# Altium PCB SyncBoard1.PcbDoc (part 1 of 4)
Units mm, origin at the board's own origin, x right, y up, seen from the top; angles counter-clockwise.
Board outline 300 x 250 mm, 2 copper layers (Top Layer, Bottom Layer); 311 components, 299 nets, 1572 pads, 3310 vias.
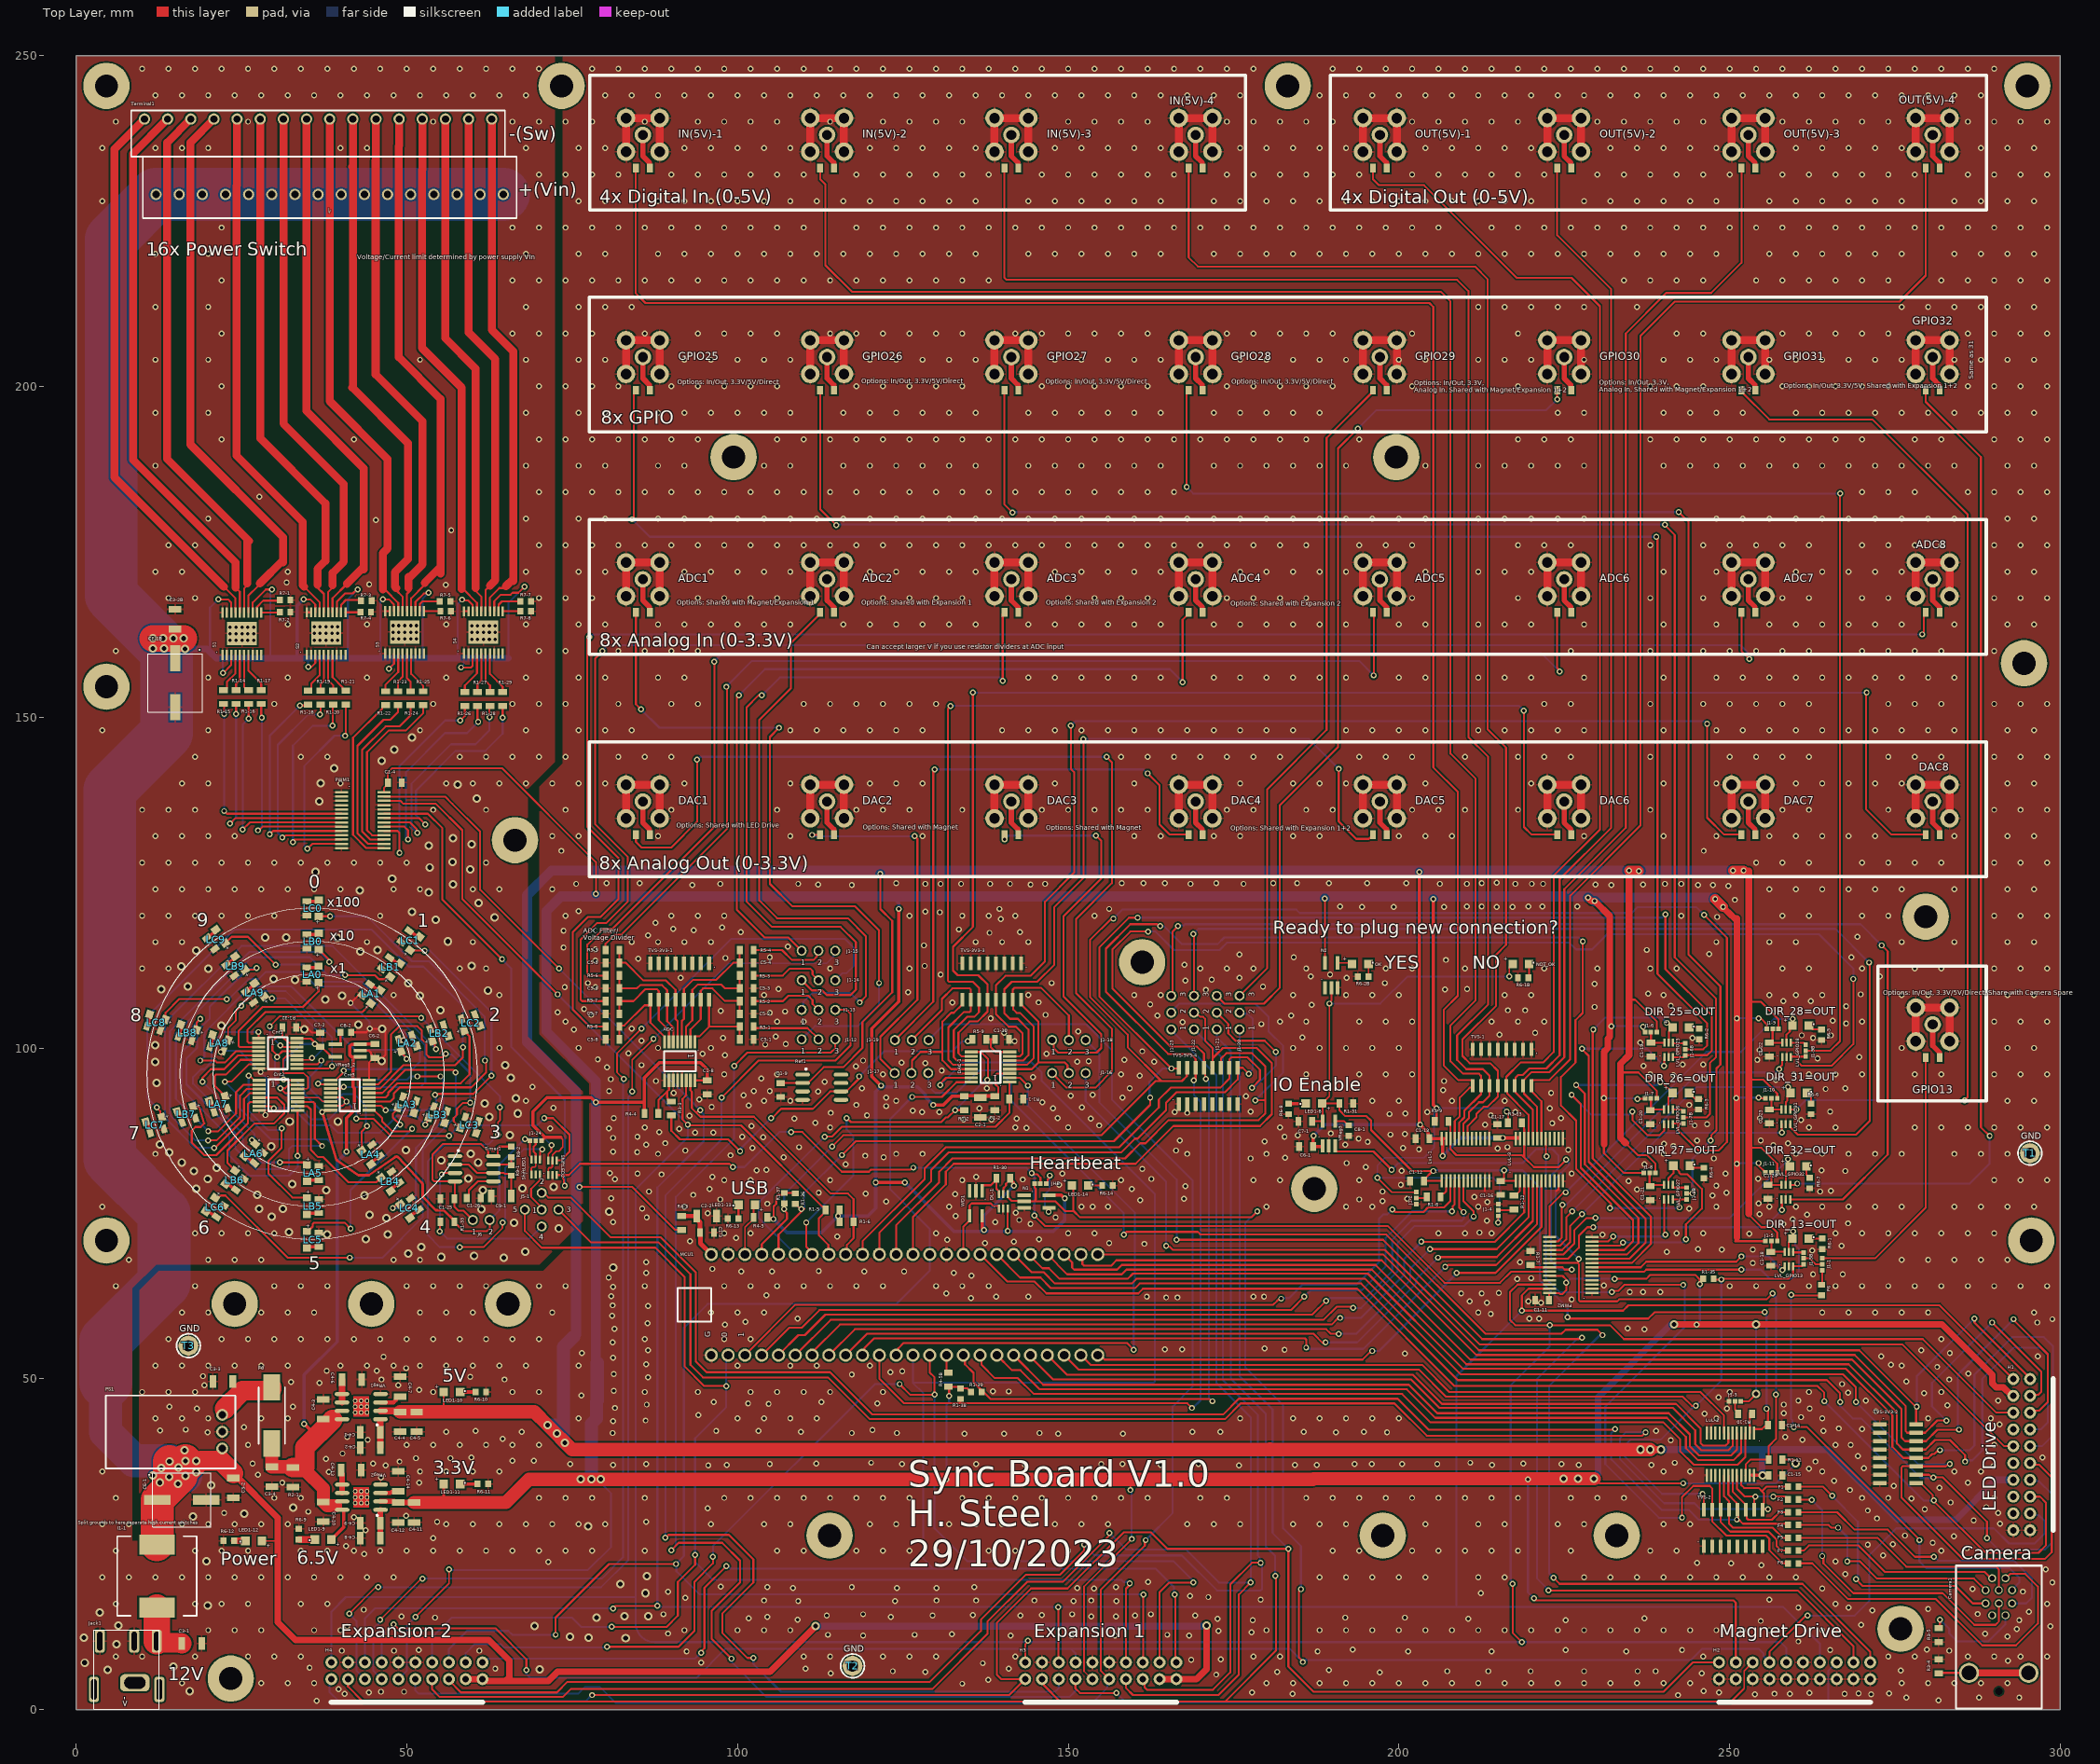
[diagram p0: Top Layer view]
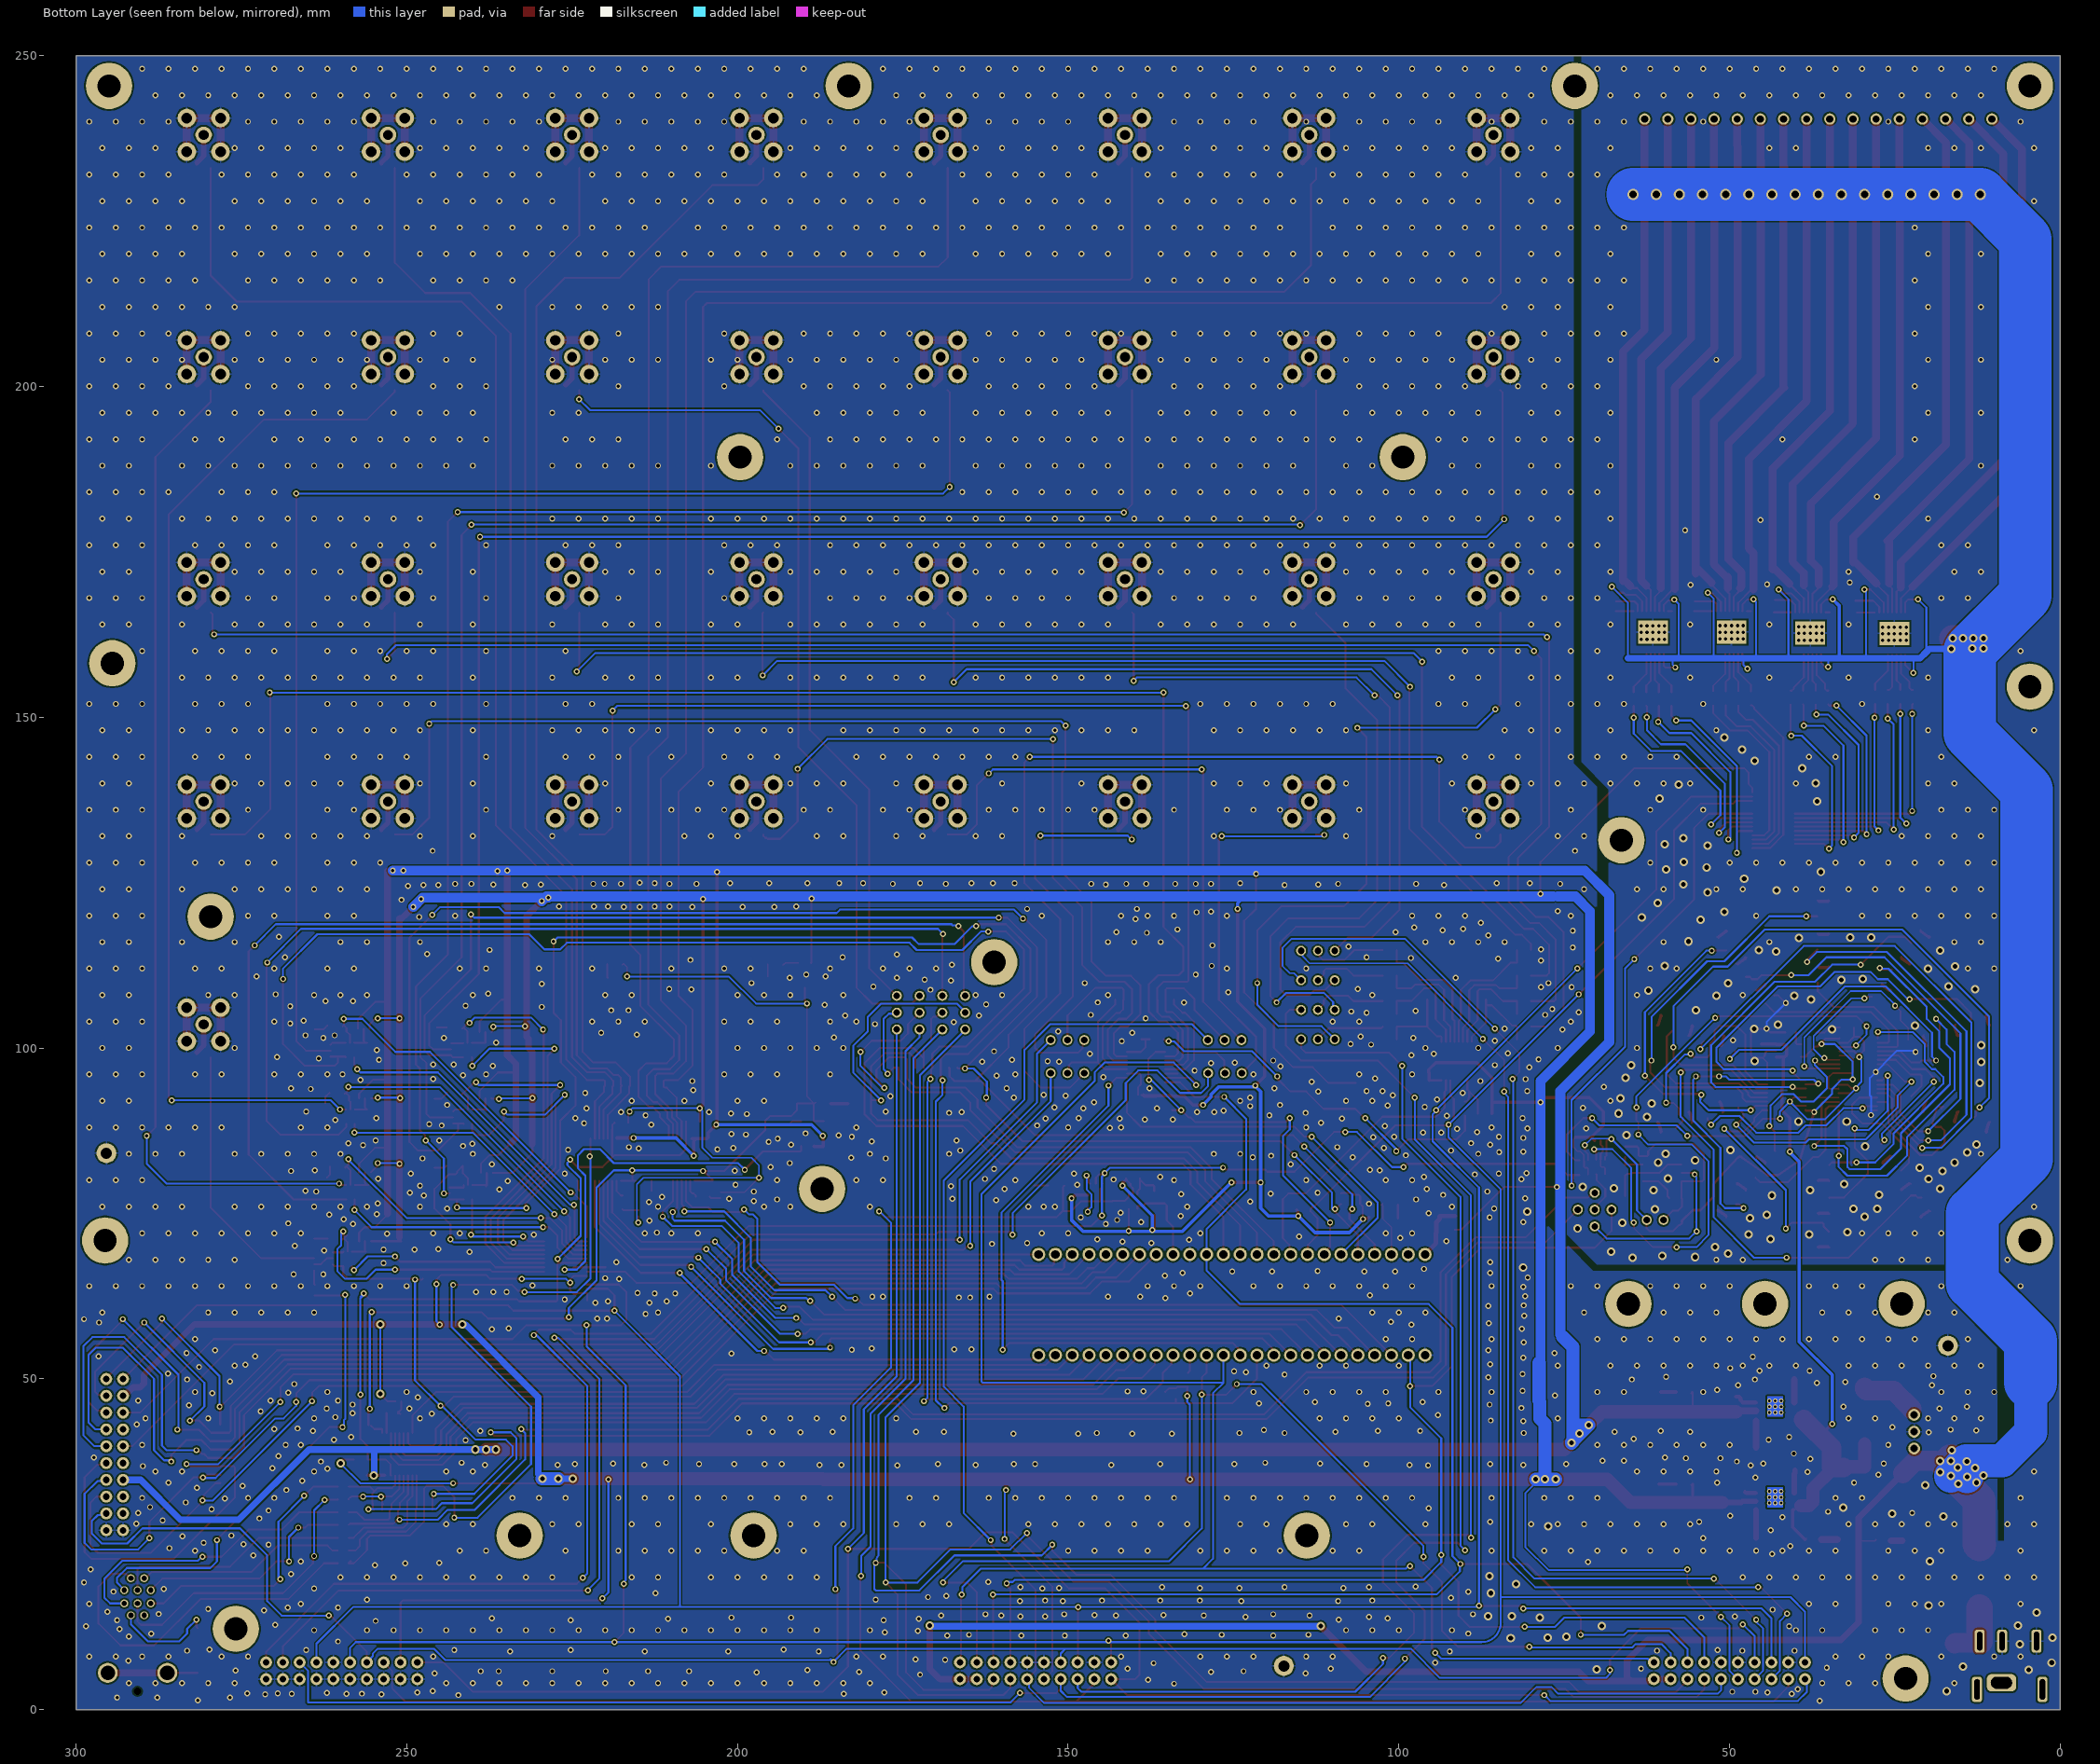
[diagram p1: Bottom Layer view, seen from below]

## Layer stack, top to bottom
Top Solder: solder mask 0.0102, Solder Resist, Dk 3.5
Top Layer: signal copper 0.0356
Dielectric 1: dielectric 0.32, FR-4, Dk 4.8
Bottom Layer: signal copper 0.0356
Bottom Solder: solder mask 0.0102, Solder Resist, Dk 3.5

## Board outline
0,0 300,0 300,250 0,250

## Design rules (kind name [scope] priority, off if disabled: settings)
Clearance [All] p1: gap=0.25 ignorepadtopadclearanceinfootprint=TRUE except(0: Arc-Text Track-Text SMDPad-Text THPad-Text Via-Text Fill-Text Poly-Text Region-Text Text-Text Text-Hole; 0.2: SMDPad-SMDPad THPad-THPad)
HoleSize [All] p1: absolutevalues=TRUE maxlimit=99 minlimit=0.025 maxpercent=80.000 minpercent=20.000
MinimumSolderMaskSliver [All] p1: minsoldermaskwidth=0
PlaneConnect [All] p1: planeconnectstyle=Direct reliefexpansion=0.508 reliefentries=4 reliefconductorwidth=0.254 reliefairgap=0.254
PolygonConnect [All] p1: thpad.connectstyle=Relief thpad.reliefconductorwidth=0.3 thpad.reliefentries=4 thpad.polygonreliefangle="90 Angle" thpad.airgapwidth=0.254 smdpad.connectstyle=Relief smdpad.reliefconductorwidth=0.3 smdpad.reliefentries=4 smdpad.polygonreliefangle="90 Angle" smdpad.airgapwidth=0.254 via.connectstyle=Direct via.reliefconductorwidth=0.5 via.reliefentries=4 via.polygonreliefangle="90 Angle" via.airgapwidth=0.254
RoomDefinition SyncBoard1 [InComponentClass('SyncBoard1')] p1: confinementstyle=ConfineIn formatcopy=TRUE lockcomponents=FALSE outline 303.8,45.1 347.9,45.1 347.9,114.9 303.8,114.9
RoutingVias [All] p1: holewidth=0.45 width=0.8 viastyle="Through Hole" minholewidth=0.3 minwidth=0.5 maxholewidth=2 maxwidth=10
SolderMaskExpansion [All] p1: expansion=0.102 istentingtop=FALSE
Width [All] p1: maxlimit=50 minlimit=0.254 preferedwidth=0.254 minimp=50.000000 maximp=50.000000 favimp=50.000000
27 further rules are at their usual default settings.

## Classes and differential pairs
component class SyncBoard1: ADC ADC1 ADC2 ADC3 ADC4 ADC5 ADC6 ADC7 ADC8 C2-1 C2-2 C3-1 C3-2 C3-2B C3-3 C3-4 C4-1 C4-2 C4-3 C4-4 C4-5 C4-6 C4-7 C4-8 C4-9 C4-10 C4-11 C4-12 C4-13 C4-14 C5-1 C5-2 C5-3 C5-4 C5-5 C5-6 C5-7 C5-8 C6-1 C6-2 C7-1 C7-2 C8-1 C8-2 C9-1 Camera1 CE-1 CE-1B Cnt1 Cnt2 Cnt3 DAC1 DAC2 DAC3 DAC4 DAC5 DAC6 DAC7 DAC8 DAC-1 DIR_13=OUT DIR_25=OUT DIR_26=OUT DIR_27=OUT DIR_28=OUT DIR_31=OUT DIR_32=OUT DL-1 F0 F1 F2 F3 F4 F5 F6 F7 F8 GPIO13 GPIO25 GPIO26 GPIO27 GPIO28 GPIO29 GPIO30 GPIO31 GPIO32 H1 H2 H3 H4 I1-1 IN(5V)-1 IN(5V)-2 IN(5V)-3 IN(5V)-4 J1-1 J1-2 J1-3 J1-4 J1-5 J1-5B J1-6 J1-6B J1-7 J1-7B J1-8 J1-8B J1-9 J1-9B J1-10 J1-11 J1-12 J1-13 J1-14 J1-15 J1-16 J1-17 J1-18 J1-19 J1-20 J1-21 J1-22 J1-23 J1-24 J5-1 J6 Jack1 JHB LA0 LA1 LA2 LA3 LA4 LA5 LA6 LA7 LA8 LA9 LB0 LB1 LB2 LB3 LB4 LB5 LB6 LB7 LB8 LB9 LC0 LC1 LC2 LC3 LC4 LC5 LC6 LC7 LC8 LC9 LED1-8 LED1-9 LED1-10 LED1-11 LED1-12 LED1-13 LED1-14 LvL-1 LvL-2 LvL-3 LVL_GPIO13 LVL_GPIO25 LVL_GPIO26 LVL_GPIO27 LVL_GPIO28 LVL_GPIO31 LVL_GPIO32 MCU1 N1 N2 NOT_OK OK OUT(5V)-1 OUT(5V)-2 OUT(5V)-3 OUT(5V)-4 PS1 PWM1 PWM2 R1-1 R1-2 R1-5 R1-6 R1-7 R1-8 R1-9 R1-10 R1-11 R1-12 R1-13 R1-14 R1-15 R1-16 R1-17 R1-18 R1-19 R1-20 R1-21 R1-22 R1-23 R1-24 R1-25 R1-26 R1-27 R1-28 R1-29 R1-30 R1-31 R1-32 R1-33 R1-35 R1-36 R1-37 R1-38 R1-39 R2-1 R3-3 R3-4 R3-5 R4-3 R4-4 R4-5 R4-5B R5-1 R5-2 R5-3 R5-4 R5-5 R5-6 R5-7 R5-8 R5-9 R6-1 R6-1B R6-2 R6-2B R6-3 R6-4 R6-5 R6-6 R6-7 R6-8 R6-9 R6-10 R6-11 R6-12 R6-13 R6-14 R7-1 R7-2 R7-3 R7-4 R7-5 R7-6 R7-7 R7-8 R9-1 R9-2 Ref1 S1 S2 S3 S4 ShiftLED1 ShiftLED2 T1 T2 T3 Terminal1 Timer1 TVS-1 TVS-2 TVS-3V3-1 TVS-3V3-2 TVS-3V3-3 TVS-3V3-4 VReg1 VReg2 VReg3 VReg5_2 WD1

## Components (designator, comment, footprint, x,y, rotation, side; value= is the part's Value field where it differs from the comment)
ADC "ADS7828" 16-TSSOP 93.546,100.9 r270 top
ADC1 "SMA_Female" SMA_Ferrite 85.7,170.831 r180 top
ADC2 "SMA_Female" SMA_Ferrite 113.557,170.831 r180 top
ADC3 "SMA_Female" SMA_Ferrite 141.414,170.831 r180 top
ADC4 "SMA_Female" SMA_Ferrite 169.271,170.831 r180 top
ADC5 "SMA_Female" SMA_Ferrite 197.129,170.831 r180 top
ADC6 "SMA_Female" SMA_Ferrite 224.986,170.831 r180 top
ADC7 "SMA_Female" SMA_Ferrite 252.843,170.831 r180 top
ADC8 "SMA_Female" SMA_Ferrite 280.7,170.831 r180 top
C1-2 "0.1uF" 0805 138.9,92.7 r270 top
C1-3 "0.1uF" 0805 94.346,72.1 r0 top
C1-4 "0.1uF" 0805 47.146,140.1 r0 top
C1-8 "0.1uF" 0805 95.446,95.1 r270 top
C1-9 "0.1uF" 0805 106.546,94.7 r270 top
C1-10 "0.1uF" 0805 141.046,101.3 r180 top
C1-11 "0.1uF" 0805 222.7,61.9 r180 top
C1-12 "0.1uF" 0805 203.8,79.9 r180 top
C1-13 "0.1uF" 0805 202.5,86.3 r0 top
C1-14 "0.1uF" 0805 255.8,43 r0 top
C1-15 "0.1uF" 0805 258,35.4 r180 top
C1-16 "0.1uF" 0805 215.4,79.9 r270 top
C1-17 "0.1uF" 0805 214.9,88.5 r270 top
C1-18 "0.1uF" 0805 256.2,69.2 r270 top
C1-19 "0.1uF" 0805 238.1,100.8 r270 top
C1-20 "0.1uF" 0805 238,90.6 r270 top
C1-21 "0.1uF" 0805 238,79.1 r270 top
C1-22 "0.1uF" 0805 256,100.8 r270 top
C1-23 "0.1uF" 0805 256,90.7 r270 top
C1-24 "0.1uF" 0805 255.8,79.3 r270 top
C1-25 "0.1uF" 0805 55.1,77.2 r0 top
C1-26 "0.1uF" 0805 61.2,77.3 r180 top
C2-1 "10uF" 1206 136.7,89.5 r90 top
C2-2 "10uF" 1206 93.846,74.6 r0 top
C3-1 "10uF X7R" 1206 16,10 r0 top
C3-2 "10uF X7R" 1206 23.8,35 r270 top
C3-2B "10uF X7R" 1206 15,163.3 r90 top
C3-3 "10uF X7R" 1206 23.7,49.6 r180 top
C3-4 "10uF X7R" 1206 29.6,36.7 r270 top
C4-1 "22uF X7R" 1206 46,41.9 r180 top
C4-2 "22uF X7R" 1206 46,39.6 r180 top
C4-3 "22uF X7R" 1206 37.4,43.9 r90 top
C4-4 "22uF X7R" 1206 49,42 r90 top
C4-5 "22uF X7R" 1206 51.5,42 r90 top
C4-6 "10uF X7R" 1206 43.2,49.9 r180 top
C4-7 "22uF X7R" 1206 49,50.3 r270 top
C4-8 "22uF X7R" 1206 46,25.9 r180 top
C4-9 "22uF X7R" 1206 46,28.2 r180 top
C4-10 "22uF X7R" 1206 37.4,31.4 r270 top
C4-11 "22uF X7R" 1206 51.1,28.3 r90 top
C4-12 "22uF X7R" 1206 48.7,28.3 r90 top
C4-13 "10uF X7R" 1206 43.1,36.2 r180 top
C4-14 "22uF X7R" 1206 48.7,36 r270 top
C5-1 "NC" 0805 100.346,101.3 r0 top
C5-2 "NC" 0805 100.346,105.157 r0 top
C5-3 "NC" 0805 100.346,109.014 r0 top
C5-4 "NC" 0805 100.346,112.871 r0 top
C5-5 "NC" 0805 82.146,112.871 r180 top
C5-6 "NC" 0805 82.146,109.014 r180 top
C5-7 "NC" 0805 82.146,105.157 r180 top
C5-8 "NC" 0805 82.146,101.3 r180 top
C6-1 "1uF X7R" 0805 184.9,85.1 r0 top
C6-2 "1uF X7R" 0805 45.2,98.5 r90 top
C7-1 "4.7uF X7R" 0805 184.8,88.9 r0 top
C7-2 "4.7uF X7R" 0805 36.9,102.3 r270 top
C8-1 "0.01uF X7R" 0603 192.4,86.7 r90 top
C8-2 "0.01uF X7R" 0603 41.576,102.359 r180 top
C9-1 "0.33uF" 1206 62.8,77.6 r0 top
Camera1 "KinetixCameraConnector" Connector_HR212 290.7,2.75 r90 top
CE-1 "220uF" ElectrolyticCapacitor 16,31.7 r270 top
CE-1B "220uF" ElectrolyticCapacitor 15,155.2 r180 top
Cnt1 "Counter_$017" 16-TSSOP 27.6,101.45 r0 top
Cnt2 "Counter_$017" 16-TSSOP 27.7,95.1 r0 top
Cnt3 "Counter_$017" 16-TSSOP 44.3,90.6 r180 top
DAC1 "SMA_Female" SMA_Ferrite 85.7,137.246 r180 top
DAC2 "SMA_Female" SMA_Ferrite 113.557,137.246 r180 top
DAC3 "SMA_Female" SMA_Ferrite 141.414,137.246 r180 top
DAC4 "SMA_Female" SMA_Ferrite 169.271,137.246 r180 top
DAC5 "SMA_Female" SMA_Ferrite 197.129,137.246 r180 top
DAC6 "SMA_Female" SMA_Ferrite 224.986,137.246 r180 top
DAC7 "SMA_Female" SMA_Ferrite 252.843,137.246 r180 top
DAC8 "SMA_Female" SMA_Ferrite 280.7,137.246 r180 top
DAC-1 "AD5668-2" 16-TSSOP 141.146,94.85 r180 top
DIR_13=OUT "LEDindicator" LEDindicator 262,71.2 r180 top
DIR_25=OUT "LEDindicator" LEDindicator 243.9,103.1 r180 top
DIR_26=OUT "LEDindicator" LEDindicator 243.9,93.2 r180 top
DIR_27=OUT "LEDindicator" LEDindicator 244,82.2 r180 top
DIR_28=OUT "LEDindicator" LEDindicator 262,103.4 r180 top
DIR_31=OUT "LEDindicator" LEDindicator 261.7,93.2 r180 top
DIR_32=OUT "LEDindicator" LEDindicator 261.6,82.1 r180 top
DL-1 "DLatch" "6-TSSOP / SC-70-6" 139.546,75.7 r90 top
F0 "FerriteBead1" FerriteBead1 29.6,48.7 r270 top
F1 "FerriteBead2" 0603 260.4,33.7 r180 top
F2 "FerriteBead2" 0603 260.4,31.767 r180 top
F3 "FerriteBead2" 0603 260.4,29.833 r180 top
F4 "FerriteBead2" 0603 260.4,27.9 r180 top
F5 "FerriteBead2" 0603 260.4,25.967 r180 top
F6 "FerriteBead2" 0603 263.9,62.6 r90 top
F7 "FerriteBead2" 0603 260.4,24.033 r180 top
F8 "FerriteBead2" 0603 260.4,22.1 r180 top
GPIO13 "SMA_Female" SMA_Ferrite 280.7,103.55 r180 top
GPIO25 "SMA_Female" SMA_Ferrite 85.7,204.415 r180 top
GPIO26 "SMA_Female" SMA_Ferrite 113.557,204.415 r180 top
GPIO27 "SMA_Female" SMA_Ferrite 141.414,204.415 r180 top
GPIO28 "SMA_Female" SMA_Ferrite 169.271,204.415 r180 top
GPIO29 "SMA_Female" SMA_Ferrite 197.129,204.415 r180 top
GPIO30 "SMA_Female" SMA_Ferrite 224.986,204.415 r180 top
GPIO31 "SMA_Female" SMA_Ferrite 252.843,204.415 r180 top
GPIO32 "SMA_Female" SMA_Ferrite 280.7,204.415 r180 top
H1 "Header_RA_2x10" "HeaderRA 2x10" 295.421,49.963 r270 top
H2 "Header_RA_2x10" "HeaderRA 2x10" 271.26,4.6 r180 top
H3 "Header_RA_2x10" "HeaderRA 2x10" 166.36,4.6 r180 top
H4 "Header_RA_2x10" "HeaderRA 2x10" 61.46,4.6 r180 top
I1-1 "15uH" Inductor1 12.1,15.5 r90 top
IN(5V)-1 "SMA_Female" SMA_Ferrite 85.7,238 r180 top
IN(5V)-2 "SMA_Female" SMA_Ferrite 113.557,238 r180 top
IN(5V)-3 "SMA_Female" SMA_Ferrite 141.414,238 r180 top
IN(5V)-4 "SMA_Female" SMA_Ferrite 169.271,238 r180 top
J1-1 "Jumper3" Jumper3B 264,66.4 r90 top
J1-2 "Jumper3B" Jumper3B 202.6,78.2 r270 top
J1-3 "Jumper3B" Jumper3B 251.7,46.6 r180 top
J1-4 "Jumper3B" Jumper3B 215,74.6 r90 top
J1-5 "Jumper3B" Jumper3B 255.4,70.8 r0 top
J1-5B "Jumper3B" Jumper3B 261.2,69.1 r270 top
J1-6 "Jumper3B" Jumper3B 237.2,102.4 r0 top
J1-6B "Jumper3B" Jumper3B 243.3,100.7 r270 top
J1-7 "Jumper3B" Jumper3B 237.2,92.4 r0 top
J1-7B "Jumper3B" Jumper3B 243,90.4 r270 top
J1-8 "Jumper3B" Jumper3B 237,81.1 r0 top
J1-8B "Jumper3B" Jumper3B 243.5,78.9 r270 top
J1-9 "Jumper3B" Jumper3B 255.6,102.9 r0 top
J1-9B "Jumper3B" Jumper3B 261.5,100.5 r270 top
J1-10 "Jumper3B" Jumper3B 255.4,92.4 r0 top
J1-11 "Jumper3B" Jumper3B 255.4,81.2 r0 top
J1-12 "Jumper3" Jumper 109.706,101.3 r0 top
J1-13 "Jumper3" Jumper 109.706,105.767 r0 top
J1-14 "Jumper3" Jumper 109.706,110.233 r0 top
J1-15 "Jumper3" Jumper 109.706,114.7 r0 top
J1-16 "Jumper3" Jumper 147.566,96.2 r0 top
J1-17 "Jumper3" Jumper 123.766,96.2 r0 top
J1-18 "Jumper3" Jumper 147.566,101.2 r0 top
J1-19 "Jumper3" Jumper 123.806,101.2 r0 top
J1-20 "Jumper3" Jumper 175.913,102.8 r90 top
J1-21 "Jumper3" Jumper 172.468,102.8 r90 top
J1-22 "Jumper3" Jumper 169.024,102.8 r90 top
J1-23 "Jumper3" Jumper 165.579,102.8 r90 top
J1-24 "Jumper3B" Jumper3B 68.6,86 r0 top
J5-1 "Jumper5" Jumper5 70.4,75.56 r0 top
J6 "Jumper2_Pins" Jumper2_Pins 60,74 r0 top
Jack1 "Jack1" PowerJack 12.2,10.35 r180 top
JHB "Jumper3B" Jumper3B 146.7,79.5 r180 top
LA0 "LEDSINGLESIDE" LedSingleSide 35.765,111.111 r90.13 top
LA1 "LEDSINGLESIDE" LedSingleSide 44.575,108.256 r54.18 top
LA2 "LEDSINGLESIDE" LedSingleSide 50.054,100.737 r18.02 top
LA3 "LEDSINGLESIDE" LedSingleSide 50.172,91.454 r342.09 top
LA4 "LEDSINGLESIDE" LedSingleSide 44.616,83.974 r306.03 top
LA5 "LEDSINGLESIDE" LedSingleSide 35.817,81.082 r270.09 top
LA6 "LEDSINGLESIDE" LedSingleSide 26.955,83.974 r229.49 top
LA7 "LEDSINGLESIDE" LedSingleSide 21.619,91.46 r196.8 top
LA8 "LEDSINGLESIDE" LedSingleSide 21.534,100.735 r162 top
LA9 "LEDSINGLESIDE" LedSingleSide 26.983,108.235 r126 top
LB0 "LEDSINGLESIDE" LedSingleSide 35.8,116.1 r90 top
LB1 "LEDSINGLESIDE" LedSingleSide 47.556,112.28 r54 top
LB2 "LEDSINGLESIDE" LedSingleSide 54.821,102.28 r18 top
LB3 "LEDSINGLESIDE" LedSingleSide 54.821,89.92 r342 top
LB4 "LEDSINGLESIDE" LedSingleSide 47.556,79.92 r306 top
LB5 "LEDSINGLESIDE" LedSingleSide 35.8,76.1 r270 top
LB6 "LEDSINGLESIDE" LedSingleSide 24.044,79.92 r234 top
LB7 "LEDSINGLESIDE" LedSingleSide 16.779,89.92 r198 top
LB8 "LEDSINGLESIDE" LedSingleSide 16.779,102.28 r162 top
LB9 "LEDSINGLESIDE" LedSingleSide 24.044,112.28 r126 top
LC0 "LEDSINGLESIDE" LedSingleSide 35.8,121.1 r90 top
LC1 "LEDSINGLESIDE" LedSingleSide 50.495,116.325 r54 top
LC2 "LEDSINGLESIDE" LedSingleSide 59.589,103.834 r18.01 top
LC3 "LEDSINGLESIDE" LedSingleSide 59.576,88.375 r342 top
LC4 "LEDSINGLESIDE" LedSingleSide 50.495,75.875 r306 top
LC5 "LEDSINGLESIDE" LedSingleSide 35.8,71.021 r270 top
LC6 "LEDSINGLESIDE" LedSingleSide 21.052,75.822 r235.95 top
LC7 "LEDSINGLESIDE" LedSingleSide 12.017,88.325 r196.14 top
LC8 "LEDSINGLESIDE" LedSingleSide 12.024,103.825 r162 top
LC9 "LEDSINGLESIDE" LedSingleSide 21.105,116.325 r126 top
LED1-8 "LEDindicator" LEDindicator 185.9,91.6 r0 top
LED1-9 "LEDindicator" LEDindicator 36.1,25.7 r0 top
LED1-10 "LEDindicator" LEDindicator 58.1,48 r180 top
LED1-11 "LEDindicator" LEDIndicator 58.1,34.1 r180 top
LED1-12 "LEDindicator" LEDindicator 25.6,25.5 r0 top
LED1-13 "LEDindicator" LEDindicator 100.146,76.3 r0 top
LED1-14 "LEDindicator" LEDindicator 153.046,79.2 r180 top
LvL-1 "LevelShift_8" 24-TSSOP 206.5,79.9 r90 top
LvL-2 "LevelShift_8" 24-TSSOP 253.7,41.8 r270 top
LvL-3 "LevelShift_8" 24-TSSOP 217.65,79.9 r90 top
LVL_GPIO13 "LevelShift_1" "6-TSSOP / SC-70-6" 258.3,67 r90 top
LVL_GPIO25 "LevelShift_1" "6-TSSOP / SC-70-6" 240.15,98.6 r90 top
LVL_GPIO26 "LevelShift_1" "6-TSSOP / SC-70-6" 240.1,88.5 r90 top
LVL_GPIO27 "LevelShift_1" "6-TSSOP / SC-70-6" 240.1,77.1 r90 top
LVL_GPIO28 "LevelShift_1" "6-TSSOP / SC-70-6" 257.95,98.6 r90 top
LVL_GPIO31 "LevelShift_1" "6-TSSOP / SC-70-6" 257.85,88.5 r90 top
LVL_GPIO32 "LevelShift_1" "6-TSSOP / SC-70-6" 257.85,77.1 r90 top
MCU1 "Teensy4p1" Teensy4p1 96.046,53.56 r90 top
N1 "NOT" SOT23-5 143.346,77.75 r0 top
N2 "NOT" SOT23-5 188.85,109.1 r90 top
NOT_OK "LEDindicator" LEDindicator 219.7,112.7 r180 top
OK "LEDindicator" LEDindicator 195.4,112.7 r180 top
OUT(5V)-1 "SMA_Female" SMA_Ferrite 197.129,238 r180 top
OUT(5V)-2 "SMA_Female" SMA_Ferrite 224.986,238 r180 top
OUT(5V)-3 "SMA_Female" SMA_Ferrite 252.843,238 r180 top
OUT(5V)-4 "SMA_Female" SMA_Ferrite 280.7,238 r180 top
PS1 "PS1" PowerSupplySwitch 22.1,39.46 r90 top
PWM1 "PWM28" 28-TSSOP 40.146,138.65 r0 top
PWM2 "PWM28" 28-TSSOP 229.2,62.95 r180 top
R1-1 "10k" 0805 143.2,92.3 r180 top
R1-2 "10k" 0805 134.3,90.6 r90 top
R1-5 "10k" 0805 113.346,75.5 r0 top
R1-6 "10k" 0805 117.546,73.7 r180 top
R1-7 "10k" 0805 219.9,67.2 r90 top
R1-8 "10k" 0805 204.2,77.5 r0 top
R1-9 "10k" 0805 207.5,88.9 r180 top
R1-10 "10k" 0805 251.3,44.7 r0 top
R1-11 "10k" 0805 255.9,37.8 r0 top
R1-12 "10k" 0805 217.4,75.6 r90 top
R1-13 "10k" 0805 218.6,88.7 r180 top
R1-14 "10k" 0805 24.2,152 r90 top
R1-15 "10k" 0805 22.3,152 r90 top
R1-16 "10k" 0805 26.1,152 r90 top
R1-17 "10k" 0805 28,152 r90 top
R1-18 "10k" 0805 35.1,151.9 r90 top
R1-19 "10k" 0805 37,151.9 r90 top
R1-20 "10k" 0805 38.9,151.9 r90 top
R1-21 "10k" 0805 40.8,151.9 r90 top
R1-22 "10k" 0805 46.8,151.8 r90 top
R1-23 "10k" 0805 48.7,151.8 r90 top
R1-24 "10k" 0805 50.6,151.8 r90 top
R1-25 "10k" 0805 52.5,151.8 r90 top
R1-26 "10k" 0805 58.8,151.7 r90 top
R1-27 "10k" 0805 60.7,151.7 r90 top
R1-28 "10k" 0805 62.6,151.7 r90 top
R1-29 "10k" 0805 64.5,151.7 r90 top
R1-30 "10K" 0805 139.146,80.3 r0 top
R1-31 "10K" 0805 193.1,91.6 r180 top
R1-32 "10K" 0805 33.3,103.1 r180 top
R1-33 "NC" 0805 57.2,73.7 r180 top
R1-35 "PU" 0603 247.58,65.12 r180 top
R1-36 "PU" 0603 108.74,76.42 r90 top
R1-37 "PU" 0603 107.09,76.49 r90 top
R1-38 "PU" 0603 133.73,46.95 r90 top
R1-39 "PU" 0603 136.91,47.98 r180 top
R2-1 "681" 1206 32.8,33.6 r90 top
R3-3 "0" 0805 90,89.8 r90 top
R3-4 "0" 0805 281.6,5.5 r90 top
R3-5 "0" 0805 281.6,12.3 r270 top
R4-3 "NC" 0805 91.546,74.6 r270 top
R4-4 "NC" 0805 88.046,90.1 r180 top
R4-5 "NC" 0805 102.446,74.4 r0 top
R4-5B "NC" 0805 131.9,50.9 r270 top
R5-1 "0" 0805 100.346,103.229 r0 top
R5-2 "0" 0805 100.346,107.086 r0 top
R5-3 "0" 0805 100.346,110.943 r0 top
R5-4 "0" 0805 100.346,114.8 r0 top
R5-5 "0" 0805 82.146,114.8 r180 top
R5-6 "0" 0805 82.146,110.943 r180 top
R5-7 "0" 0805 82.146,107.086 r180 top
R5-8 "0" 0805 82.146,103.229 r180 top
R5-9 "0" 0805 137.646,101.3 r180 top
R6-1 "500" 0603 264,71.2 r270 top
R6-1B "500" 0603 219.6,110.6 r180 top
R6-2 "500" 0603 245.4,102.9 r270 top
R6-2B "500" 0603 195.4,110.8 r180 top
R6-3 "500" 0603 245.3,92.3 r270 top
R6-4 "500" 0603 246.1,81.9 r270 top
R6-5 "500" 0603 263.9,102.8 r270 top
R6-6 "500" 0603 262.3,91.6 r270 top
R6-7 "500" 0603 262.1,80.4 r270 top
R6-8 "500" 0603 183.3,91.6 r270 top
R6-9 "500" 0603 33.7,25.7 r90 top
R6-10 "500" 0603 60.4,48 r0 top
R6-11 "500" 0603 60.7,34.1 r0 top
R6-12 "500" 0603 23.9,25.5 r180 top
R6-13 "500" 0603 100.146,74.2 r180 top
R6-14 "500" 0603 155.146,79.2 r0 top
R7-1 "60k" 0603 30.8,167.7 r0 top
R7-2 "60k" 0603 30.8,165.9 r0 top
R7-3 "60k" 0603 43.1,167.6 r0 top
R7-4 "60k" 0603 43,165.9 r0 top
R7-5 "60k" 0603 55,167.5 r0 top
R7-6 "60k" 0603 55.1,166 r0 top
R7-7 "60k" 0603 67.2,167.5 r0 top
R7-8 "60k" 0603 67.2,166 r0 top
R9-1 "270k" 0603 65.8,80.7 r90 top
R9-2 "270k" 0603 65.8,83.5 r90 top
Ref1 "3V3Reference" 8-SOIC-NoHeatPad 109.846,95.97 r0 top
S1 "Switch_4" 20-HTSSOP 25.089,162.6 r90 top
S2 "Switch_4" 20-HTSSOP 37.8,162.65 r90 top
S3 "Switch_4" 20-HTSSOP 49.7,162.816 r90 top
S4 "Switch_4" 20-HTSSOP 61.6,162.8 r90 top
ShiftLED1 "LevelShift_1" "6-TSSOP / SC-70-6" 68.85,80.9 r90 top
ShiftLED2 "LevelShift_1" "6-TSSOP / SC-70-6" 71.4,80.8 r90 top
T1 "TEstPoint" TestPoint 295.4,84.1 r0 top
T2 "TEstPoint" TestPoint 117.4,6.6 r0 top
T3 "TEstPoint" TestPoint 17,55 r0 top
Terminal1 "Header_16x2" "Header 2x16" 12.1,229 r180 top
Timer1 "TImer_555" 8-SOIC-NoHeatPad 57.3,83.64 r0 top
TVS-1 "TVS Diode Array" 16-SOIC 220.04,99.8 r270 top
TVS-2 "TVS Diode Array" 16-SOIC 246.09,24.7 r90 top
TVS-3V3-1 "TVS Diode Array" 16-SOIC 95.716,112.8 r270 top
TVS-3V3-2 "TVS Diode Array" 16-SOIC 272.7,43.11 r0 top
TVS-3V3-3 "TVS Diode Array" 16-SOIC 142.886,112.8 r270 top
TVS-3V3-4 "TVS Diode Array" 16-SOIC 166.736,91.5 r90 top
VReg1 "5VReg" 8-SOIC 46.021,43.884 r180 top
VReg2 "3V3Reg" 8-SOIC 46.032,30.195 r180 top
VReg3 "3.3V Regulator" SOT23-5 188.45,85.2 r90 top
VReg5_2 "3.3V Regulator" SOT23-5 42.956,98.657 r180 top
WD1 "Watchdog" SOT23-5 136.996,78.4 r270 top

## Footprints (in the part's own frame and the unit in brackets; to place one, negate y for a bottom-side part, rotate by r counter-clockwise, add the part's x,y. Pads: shape width x height; smd on the part's side, far side on the other; paste and mask are expansions set on the pad)
"6-TSSOP / SC-70-6" [mm]
  rect 1.2x0.35 smd mask+0.05: 1(0,0) 2(0,-0.65) 3(0,-1.3) 4(2.2,-1.3) 5(2.2,-0.65) 6(2.2,0)
8-SOIC [mm]
  round 0.7 hole 0.4 mask+0.05: 0(2.032,-1.016) 0(2.032,-2.794) 0(2.032,-1.905) 0(2.921,-1.016) 0(2.921,-2.794) 0(2.921,-1.905) 0(3.81,-2.794) 0(3.81,-1.905) 0(3.81,-1.016)
  oval 2.2x0.6 smd: 1(0,0) 2(0,-1.27) 3(0,-2.54) 4(0,-3.81) 5(5.8,-3.81) 6(5.8,-2.54) 7(5.8,-1.27) 8(5.8,0)
  Top Layer region: 1.7,-3.456 4.1,-3.456 4.1,-0.356 1.7,-0.356
  Bottom Layer region: 1.7,-3.456 4.1,-3.456 4.1,-0.356 1.7,-0.356
  silkscreen extent 0.37,0.73 0.62,0.97, body extent 0.9,-4.41 4.9,0.6, height 1.75
8-SOIC-NoHeatPad [mm]
  oval 2.2x0.6 smd: 1(0,0) 2(0,-1.27) 3(0,-2.54) 4(0,-3.81) 5(5.8,-3.81) 6(5.8,-2.54) 7(5.8,-1.27) 8(5.8,0)
  silkscreen extent 0.38,0.73 0.63,0.97, body extent 0.9,-4.41 4.9,0.6, height 1.75
16-SOIC [mm]
  rect 2x0.6 smd mask+0.05: 1(0,0) 2(0,-1.27) 3(0,-2.54) 4(0,-3.81) 5(0,-5.08) 6(0,-6.35) 7(0,-7.62) 8(0,-8.89) 9(5.5,-8.89) 10(5.5,-7.62) 11(5.5,-6.35) 12(5.5,-5.08) 13(5.5,-3.81) 14(5.5,-2.54) 15(5.5,-1.27) 16(5.5,0)
16-TSSOP [mm]
  rect 2x0.45 smd mask+0.02: 1(0,0) 2(0,-0.65) 3(0,-1.3) 4(0,-1.95) 5(0,-2.6) 6(0,-3.25) 7(0,-3.9) 8(0,-4.55) 9(5.8,-4.55) 10(5.8,-3.9) 11(5.8,-3.25) 12(5.8,-2.6) 13(5.8,-1.95) 14(5.8,-1.3) 15(5.8,-0.65) 16(5.8,0)
  silkscreen extent 1.4,-4.65 4.4,0.15
20-HTSSOP [mm]
  rect 1.5x0.35 smd mask+0.05: 1(-3.2,2.925) 2(-3.2,2.275) 3(-3.2,1.625) 4(-3.2,0.975) 5(-3.2,0.325) 6(-3.2,-0.325) 7(-3.2,-0.975) 8(-3.2,-1.625) 9(-3.2,-2.275) 10(-3.2,-2.925) 11(3.2,-2.925) 12(3.2,-2.275) 13(3.2,-1.625) 14(3.2,-0.975) 15(3.2,-0.325) 16(3.2,0.325) 17(3.2,0.975) 18(3.2,1.625) 19(3.2,2.275) 20(3.2,2.925)
  round 0.8 hole 0.5 mask+0.05: 21(-1.016,1.778) 21(-1.016,-0.889) 21(-1.016,0) 21(-1.016,0.889) 21(-1.016,-1.778) 21(0,1.778) 21(0,0.889) 21(0,0) 21(0,-0.889) 21(0,-1.778) 21(1.016,1.778) 21(1.016,-0.889) 21(1.016,0) 21(1.016,0.889) 21(1.016,-1.778)
  rect 3.5x4.5 smd mask+0.05: 21(0.05,0)
  rect 3.5x4.5 smd far side mask+0.05: 21(0.05,0)
24-TSSOP [mm]
  rect 2x0.35 smd mask+0.05: 1(0,0) 2(0,-0.65) 3(0,-1.3) 4(0,-1.95) 5(0,-2.6) 6(0,-3.25) 7(0,-3.9) 8(0,-4.55) 9(0,-5.2) 10(0,-5.85) 11(0,-6.5) 12(0,-7.15) 13(6.4,-7.15) 14(6.4,-6.5) 15(6.4,-5.85) 16(6.4,-5.2) 17(6.4,-4.55) 18(6.4,-3.9) 19(6.4,-3.25) 20(6.4,-2.6) 21(6.4,-1.95) 22(6.4,-1.3) 23(6.4,-0.65) 24(6.4,0)
28-TSSOP [mm]
  rect 2x0.35 smd mask+0.05: 1(0,0) 2(0,-0.65) 3(0,-1.3) 4(0,-1.95) 5(0,-2.6) 6(0,-3.25) 7(0,-3.9) 8(0,-4.55) 9(0,-5.2) 10(0,-5.85) 11(0,-6.5) 12(0,-7.15) 13(0,-7.8) 14(0,-8.45) 15(6.4,-8.45) 16(6.4,-7.8) 17(6.4,-7.15) 18(6.4,-6.5) 19(6.4,-5.85) 20(6.4,-5.2) 21(6.4,-4.55) 22(6.4,-3.9) 23(6.4,-3.25) 24(6.4,-2.6) 25(6.4,-1.95) 26(6.4,-1.3) 27(6.4,-0.65) 28(6.4,0)
0603 [mm]
  rect 0.9x1 smd mask+0.05: 1(0,0) 2(1.6,0)
0805 [mm]
  rect 0.9x1.3 smd: 1(2.1,0) 2(0,0)
1206 [mm]
  rect 1x1.9 smd mask+0.05: 1(0,0) 2(3,0)
Connector_HR212 [mm]
  round 0 hole 1.1 mask+0.05: 0(0,0)
  round 3 hole 2.2 mask+0.05: 1(2.8,4.5) 1(2.8,-4.5)
  round 1.2 hole 0.8 mask+0.05: 2(11.5,1) 3(11.5,-1) 4(13.3,2) 5(13.3,0) 6(13.3,-2) 7(15.3,2) 8(15.3,0) 9(15.3,-2) 10(17.1,1) 11(17.1,-1)
  silkscreen extent -2.6,-6.5 19,6.5
ElectrolyticCapacitor [mm]
  rect 1.5x4 smd: 1(0,-3.7) 2(0,3.7)
  silkscreen extent -4.1,-4.4 4.1,4.4
FerriteBead1 [mm]
  rect 4x2.5 smd mask+0.05: 1(0,0) 2(8.5,0)
  silkscreen extent 0,-2 8.5,2
"Header 2x16" [mm]
  round 1.7 hole 1.1: 1(0,0) 2(1.75,-11.4) 3(-3.5,0) 4(-1.75,-11.4) 5(-7,0) 6(-5.25,-11.4) 7(-10.5,0) 8(-8.75,-11.4) 9(-14,0) 10(-12.25,-11.4) 11(-17.5,0) 12(-15.75,-11.4) 13(-21,0) 14(-19.25,-11.4) 15(-24.5,0) 16(-22.75,-11.4) 17(-28,0) 18(-26.25,-11.4) 19(-31.5,0) 20(-29.75,-11.4) 21(-35,0) 22(-33.25,-11.4) 23(-38.5,0) 24(-36.75,-11.4) 25(-42,0) 26(-40.25,-11.4) 27(-45.5,0) 28(-43.75,-11.4) 29(-49,0) 30(-47.25,-11.4) 31(-52.5,0) 32(-50.75,-11.4)
  silkscreen extent -54.5,-12.7 3.75,3.6
"HeaderRA 2x10" [mm]
  round 1.8 hole 1 mask+0.05: 1(0,0) 2(2.54,0) 3(5.08,0) 4(7.62,0) 5(10.16,0) 6(12.7,0) 7(15.24,0) 8(17.78,0) 9(20.32,0) 10(22.86,0) 11(22.86,-2.54) 12(20.32,-2.54) 13(17.78,-2.54) 14(15.24,-2.54) 15(12.7,-2.54) 16(10.16,-2.54) 17(7.62,-2.54) 18(5.08,-2.54) 19(2.54,-2.54) 20(0,-2.54)
  silkscreen extent 0,3.5 22.86,3.5
Inductor1 [mm]
  rect 3x5.4 smd: 1(-0.068,-0.142) 2(9.432,-0.142)
  silkscreen extent -1.32,-6.14 10.68,5.86
Jumper [mm]
  round 1.5 hole 1.02 mask+0.05: 1(0,0) 2(2.54,0) 3(5.08,0)
Jumper2_Pins [mm]
  round 1.5 hole 1.02 mask+0.05: 1(0,0) 2(2.54,0)
Jumper3B [mm]
  rect 0.7x0.7 smd mask+0.05: 1(0,0) 2(0.9,0) 3(1.8,0)
Jumper5 [mm]
  round 1.5 hole 1.02 mask+0.05: 1(0,0) 2(0,2.54) 3(2.54,0) 4(0,-2.54) 5(-2.54,0)
LEDindicator [mm]
  rect 1.3x1.3 smd: 1(0,0) 2(2.5,0)
  Top Layer lines w0.254: 2.5,0 cw(c2.5,0.2) 2.3,0.2
LEDIndicator [mm]
  rect 1.3x1.3 smd: 1(0,0) 2(2.5,0)
  Top Layer lines w0.254: 2.5,0 cw(c2.5,0.2) 2.3,0.2
LedSingleSide [mm]
  rect 0.9x1.3 smd: 0(1.05,0.9) 2(-1.05,0.9)
  rect 1.1x1.25 smd: 0(1.25,-0.9) 1(-1.25,-0.9)
  Top Layer lines w0.254: 1.05,0.9 cw(c1.05,0.7) 1.25,0.7 ; 1.05,-0.7 ccw(c1.25,-0.7) 1.25,-0.9
  Top Layer lines w0.5: 1.05,0.7 1.05,-0.7
PowerJack [mm]
  rrect50% 1.5x3.8 hole 0.8 slot 3.1 at 90 deg: 0(-0.4,7.3) 0(9.5,7.3)
  rrect50% 4.4x2.6 hole 1.8 slot 3.2 at 0 deg: 0(3.3,6.3)
  rrect50% 1.5x3.5 hole 0.8 slot 2.8 at 90 deg: 1(0,0) 2(8.6,0) 3(3.4,0)
  silkscreen extent -0.4,-1.7 9.5,10.3
PowerSupplySwitch [mm]
  round 1.8 hole 1.1: 1(0,0) 2(2.54,0) 3(5.08,0)
  silkscreen extent -3,-2 8,17.6
SMA_Ferrite [mm]
  rect 0.9x1.3 smd: 0(-1.05,5) 1(1.05,5)
  round 2.5 hole 1.5 mask+0.05: 0(0,0)
  round 2.8 hole 1.6 mask+0.05: 2(-2.55,2.55) 2(-2.55,-2.55) 2(2.55,2.55) 2(2.55,-2.55)
  Top Layer lines w0.8: 0,0 0,3.2 -1,4.2
  Top Layer lines w1.2: 2.55,2.55 2.55,-2.55 -2.55,-2.55 -2.55,2.55
SOT23-5 [mm]
  rect 2x0.55 smd mask+0.02: 1(0,0) 2(0,-0.95) 3(0,-1.9) 4(3.75,-1.9) 5(3.75,0)
Teensy4p1 [mm]
  round 2 hole 1.3 mask+0.05: 0(0,0) 1(0,-2.54) 2(0,-5.08) 3(0,-7.62) 4(0,-10.16) 5(0,-12.7) 6(0,-15.24) 7(0,-17.78) 8(0,-20.32) 9(0,-22.86) 10(0,-25.4) 11(0,-27.94) 12(0,-30.48) 13(0,-33.02) 14(0,-35.56) 15(0,-38.1) 16(0,-40.64) 17(0,-43.18) 18(0,-45.72) 19(0,-48.26) 20(0,-50.8) 21(0,-53.34) 22(0,-55.88) 23(0,-58.42) 24(15.24,-58.42) 25(15.24,-55.88) 26(15.24,-53.34) 27(15.24,-50.8) 28(15.24,-48.26) 29(15.24,-45.72) 30(15.24,-43.18) 31(15.24,-40.64) 32(15.24,-38.1) 33(15.24,-35.56) 34(15.24,-33.02) 35(15.24,-30.48) 36(15.24,-27.94) 37(15.24,-25.4) 38(15.24,-22.86) 39(15.24,-20.32) 40(15.24,-17.78) 41(15.24,-15.24) 42(15.24,-12.7) 43(15.24,-10.16) 44(15.24,-7.62) 45(15.24,-5.08) 46(15.24,-2.54) 47(15.24,0)
  silkscreen extent 5.08,0 10.16,5.08
TestPoint [mm]
  round 3 hole 1.7 mask+0.05: 1(0,0)
  silkscreen extent -1.8,-1.8 1.8,1.8

## Part data
C1-2 C1-3 C1-4 C1-8 C1-9 C1-10 C1-11 C1-12 C1-13 C1-14 C1-15 C1-16 C1-17 C1-18 C1-19 C1-20 C1-21 C1-22 C1-23 C1-24 C1-25 C1-26 C5-1 C5-2 C5-3 C5-4 C5-5 C5-6 C5-7 C5-8 C9-1: library part Capacitor1
  C9-1: Digikey P/N=490-GRM31C5C1E334GE01LCT-ND
C2-1 C2-2: library part Capacitor1205
C3-1 C3-2 C3-2B C3-3 C3-4 C4-1 C4-2 C4-3 C4-4 C4-5 C4-6 C4-7 C4-8 C4-9 C4-10 C4-11 C4-12 C4-13 C4-14: library part "Cap 0805", "Capacitor"
  C3-1 C3-2 C3-2B C3-3 C3-4 C4-6 C4-13: Digikey P/N=587-3485-1-ND
  C4-1 C4-2 C4-3 C4-4 C4-5 C4-7 C4-8 C4-9 C4-10 C4-11 C4-12 C4-14: Digikey P/N=490-14439-1-ND
C6-1 C6-2 C7-1 C7-2 C8-1 C8-2: library part Cap, "Capacitor"
  C6-1 C6-2: Digikey P/N=587-3714-1-ND
  C7-1 C7-2: Digikey P/N=490-14466-1-ND, FP="0603 (1608 Metric)"
  C8-1 C8-2: Digikey P/N=1276-1009-1-ND, FP="0603 (1608 Metric)"
CE-1 CE-1B: library part CapElectrolytic2, "ElectrolyticCap", Digikey P/N=PCE5120CT-ND
DL-1: "D-Latch", Digikey P/N=296-16998-1-ND, FP=6-TSSOP
I1-1: library part Inductor3, "Inductor", Digikey P/N=732-11747-1-ND
Jack1: library part PowerJack3, Digikey P/N="CP-051AH-ND, 1470-3143-ND"
LA0: Note on Resistors="Two kinds depending on V drop of LED.", Digikey P/N=160-2211-2-ND
PS1: library part PowerSupplySwitching, "PowerSupplySwitching", Digikey P/N=945-2647-5-ND
PWM1 PWM2: "PWM", Digikey P/N=568-11925-1-ND
R1-1 R1-2 R1-5 R1-6 R1-7 R1-8 R1-9 R1-10 R1-11 R1-12 R1-13 R1-14 R1-15 R1-16 R1-17 R1-18 R1-19 R1-20 R1-21 R1-22 R1-23 R1-24 R1-25 R1-26 R1-27 R1-28 R1-29 R3-3 R3-4 R3-5 R4-3 R4-4 R4-5 R4-5B R5-1 R5-2 R5-3 R5-4 R5-5 R5-6 R5-7 R5-8 R5-9: library part Res1
R1-30 R1-31 R1-32 R1-33 R1-35 R1-36 R1-37 R1-38 R1-39 R2-1 R6-1 R6-1B R6-2 R6-2B R6-3 R6-4 R6-5 R6-6 R6-7 R6-8 R6-9 R6-10 R6-11 R6-12 R6-13 R6-14 R7-1 R7-2 R7-3 R7-4 R7-5 R7-6 R7-7 R7-8 R9-1 R9-2: library part Res1, "Resistor"
  R1-30 R1-31 R1-32 R1-33 R1-35 R1-36 R1-37 R1-38 R1-39: Digikey P/N=311-10.0KHRCT-ND, FP="0603 (1608 Metric)"
  R2-1: Digikey P/N=541-4611-1-ND
  R6-1 R6-1B R6-2 R6-2B R6-3 R6-4 R6-5 R6-6 R6-7 R6-8 R6-9 R6-10 R6-11 R6-12 R6-13 R6-14 R7-1 R7-2 R7-3 R7-4 R7-5 R7-6 R7-7 R7-8: Digikey P/N=2019-RK73B1JTTD201JCT-ND
  R9-1 R9-2: Digikey P/N=13-RT0603FRE07270KLCT-ND, FP="0603 (1608 Metric)"
Ref1: library part 2V5Ref, Digikey P/N=505-ADR4533BRZ-R7CT-ND
TVS-1 TVS-2 TVS-3V3-1 TVS-3V3-2 TVS-3V3-3 TVS-3V3-4: library part TVS_Diode16
  TVS-1 TVS-2: Digikey P/N=1655-S16LC05-8CT-ND
  TVS-3V3-1 TVS-3V3-2 TVS-3V3-3 TVS-3V3-4: Digikey P/N=1655-S16LC03-8CT-ND
VReg1: library part "5V Reg LowNoise", "5V Regulator Low Noise", Digikey P/N=ADM7150ARDZ-5.0-R7CT-ND
VReg2: library part "5V Reg LowNoise", "3V3 Regulator Low Noise", Digikey P/N=505-ADM7150ARDZ-3.3-R7CT-ND
VReg3 VReg5_2: library part "4V Regulator", DS=http://www.ti.com/lit/ds/symlink/lp2985-n.pdf, FP=SOT-23-5
  VReg3: Digikey P/N=296-18476-1-ND
  VReg5_2: Digikey P/N=296-20717-1-ND
ADC: Digikey P/N=296-24101-1-ND
ADC1 ADC2 ADC3 ADC4 ADC5 ADC6 ADC7 ADC8 DAC1 DAC2 DAC3 DAC4 DAC5 DAC6 DAC7 DAC8 GPIO13 GPIO25 GPIO26 GPIO27 GPIO28 GPIO29 GPIO30 GPIO31 GPIO32 IN(5V)-1 IN(5V)-2 IN(5V)-3 IN(5V)-4 OUT(5V)-1 OUT(5V)-2 OUT(5V)-3 OUT(5V)-4: Digikey P/N=2057-RF2-04A-T-00-50-G-ND
Camera1: Digikey P/N=HR1251-ND
Cnt1 Cnt2 Cnt3: Digikey P/N=296-14252-1-ND
DAC-1: Digikey P/N=505-AD5668BRUZ-1-ND
DIR_13=OUT DIR_25=OUT DIR_26=OUT DIR_27=OUT DIR_28=OUT DIR_31=OUT DIR_32=OUT LED1-8 LED1-9 LED1-10 LED1-11 LED1-12 LED1-13 LED1-14 NOT_OK OK: Digikey=https://www.digikey.co.uk/product-detail/en/osram-opto-semiconductors-inc/LG-R971-KN-1/475-1410-1-ND/1802598, Digikey P/N=475-1410-1-ND
F0: Digikey P/N=4816-BPH853025R5-101TCT-ND
F1 F2 F3 F4 F5 F6 F7 F8: Digikey P/N=445-MPZ1608S600ATAH0CT-ND
H1 H2 H3 H4: Digikey P/N="SAM8104-ND, SAM8089-ND"
J1-1 J1-2 J1-3 J1-4 J1-5 J1-5B J1-6 J1-6B J1-7 J1-7B J1-8 J1-8B J1-9 J1-9B J1-10 J1-11 J1-12 J1-13 J1-14 J1-15 J1-16 J1-17 J1-18 J1-19 J1-20 J1-21 J1-22 J1-23 J1-24 J6 JHB: Digikey P/M="609-3461-ND, S9000-ND"
LA1 LA2 LA3 LA4 LA5 LA6 LA7 LA8 LA9 LB0 LB1 LB2 LB3 LB4 LB5 LB6 LB7 LB8 LB9 LC0 LC1 LC2 LC3 LC4 LC5 LC6 LC7 LC8 LC9: Digikey P/N=160-2211-2-ND
LvL-1 LvL-2 LvL-3: Digikey P/N=296-SN74LXCH8T245PWRCT-ND
LVL_GPIO13 LVL_GPIO25 LVL_GPIO26 LVL_GPIO27 LVL_GPIO28 LVL_GPIO31 LVL_GPIO32 ShiftLED1 ShiftLED2: Digikey P/N=296-SN74LXCH1T45DCKRCT-ND
MCU1: Digikey P/N=1568-DEV-20360-ND
N1 N2: Digikey P/N=296-11607-1-ND
S1 S2 S3 S4: Digikey P/N=497-19518-1-ND
T1 T2 T3: Digikey P/N=36-5014-ND
Terminal1: Digikey P/N=277-13904-ND
Timer1: Digikey P/N=296-6501-1-ND
WD1: Digikey=https://www.digikey.co.uk/product-detail/en/stmicroelectronics/STWD100NYWY3F/497-10058-1-ND/2175107, Digikey P/N=497-10058-1-ND, FP=SOT-23-5

## Free pads (board coordinates)
  round 7 hole 3.5 mask+0.05: 2(23.4,4.7) 3(4.6,70.9) 4(4.6,154.6) 4(66.36,131.4) 4(232.94,26.3) 4(279.64,119.84) 5(4.6,245.4) 6(73.4,245.4) 7(295,245.4) 8(183.2,245.4) 9(294.5,158.15) 10(187.2,78.7) 10(295.6,70.9) 11(113.935,26.3) 11(197.56,26.3) 12(99.4,189.3) 13(199.6,189.3) 14(161.183,112.957) 15(23.992,61.319) 15(44.646,61.319) 15(65.3,61.319) 16(275.835,12.21)

## Via types
v1: diameter 0.9, hole 0.5, Top Layer to Bottom Layer, tented both sides, 3146 vias
v2: diameter 1.27, hole 0.711, Top Layer to Bottom Layer, tented both sides, 164 vias

## Nets (pads, with @x,y where several pads share a name; then routed paths per layer and width w, separated by ;. In a path a pad name is that pad's centre, name@x,y a point inside that pad or via, vN(x,y) a via of type N, cw(c..) or ccw(c..) an arc to the next point about the centre after c; other vN are vias at no path point)
3V3: ADC.16 C1-2.2 C1-4.2 C1-8.2 C1-11.2 C2-1.2 C4-11.2 C4-12.2 DAC-1.3 DL-1.3 DL-1.5 H1.19 H2.12 H3.6 H4.6 J1-2.1 J1-3.1 J1-4.1 J1-5.1 J1-6.1 J1-7.1 J1-8.1 J1-9.1 J1-10.1 J1-11.1 J1-24.3 LED1-11.2 N1.5 N2.5 PWM1.28 PWM2.24 PWM2.28 R1-2.1 R1-5.1 R1-6.1 R1-9.1 R1-11.1 R1-13.1 R1-30.1 R1-35.2 R1-36.2 R1-37.2 R1-38.2 R1-39.2 R4-4.1 R4-5.1 R4-5B.1 ShiftLED2.1 ShiftLED2.5 VReg2.2 WD1.5 | length 1297.7
  Top Layer w0.254: v1(51.3,14) 56.4,19.1 v1(56.4,21.2) ; ShiftLED2.1@71.4,80.8 71.4,81.751 71.549,81.9 71.851,81.9 72.002,82.051 72.002,82.952 ShiftLED2.5@72.05,83 72.05,83.85 72.6,84.4 73,84.4 73.6,85 73.6,86.174 73.274,86.5 ; 152.39,5.8 152.39,18.6 ; 152.4,5.8 153.6,4.6 H3.6@153.66,4.6 ; 152.4,18.6 v1(159.6,25.8) ; v1(159.4,33.2) 159.4,34.7 159.5,34.8 ; v1(196.74,80.37) 198.91,78.2 J1-2.1@202.6,78.2 ; v1(215,73.6) J1-4.1@215,74.6
  Top Layer w0.3: PWM1.28@46.546,138.65 46.546,139.3 47.146,139.9 C1-4.2@47.146,140.1 47.146,141.646 47.8,142.3 64.4,142.3 78.6,128.1 v1(78.6,123.3) ; ADC.16@93.546,95.1 C1-8.2@95.446,95.1 ; v1(105.46,74.14) 105.46,76.04 105.86,76.44 105.86,77.59 106.06,77.79 106.74,77.79 107.04,78.09 R1-37.2@107.09,78.09 108.67,78.09 R1-36.2@108.74,78.02 ; v1(132,47.4) 132,48.7 R4-5B.1@131.9,48.8 133.48,48.8 R1-38.2@133.73,48.55 134.79,48.55 135.31,48.03 R1-39.2@135.31,47.98 ; C2-1.2@136.7,92.8 136.8,92.9 138.6,92.9 C1-2.2@138.9,92.9 ; C1-2.2@139.446,92.9 139.446,94.054 139,94.5 139,95.9 139.25,96.15 DAC-1.3@141.146,96.15 ; DL-1.5@140.196,77.9 140.196,78.796 140.6,79.2 140.6,79.454 141.246,80.1 R1-30.1@141.246,80.3 ; v1@140.8,72.3 v1(140.846,72.346) DL-1.3@140.846,75.7 ; v1(188.8,122.6) 188.825,122.575 188.825,112.875 N2.5@188.85,112.85 ; R1-9.1@205.7,88.9 205.7,90.8 v1(205.7,90.9) ; v1(216.3,90.4) 216.3,90.238 216.5,90.038 R1-13.1@216.5,88.7 ; v1(220.4,16.8) 220.7,16.5 250.6,16.5 250.94,16.16 H2.12@250.94,7.14 ; C1-11.2@222.7,61.8 222.7,62.925 222.725,62.95 PWM2.28@222.8,62.95 222.825,62.925 224.25,62.925 224.375,62.8 224.7,62.8 225.3,63.4 v1(225.3,64.5) 225.3,65 224.75,65.55 PWM2.24@222.8,65.55 ; v2(229.5,34.9) 229.634,34.9 230.334,34.2 v1(243,34.2) ; 231,85.4 231,84.1 234,81.1 J1-8.1@237,81.1 ; v1(232.6,65.1) 237.4,65.1 238,65.7 244.79,65.7 245.5,64.99 v1(245.5,64.3) ; v1(236.054,92.269) 236.12,92.334 237.134,92.334 J1-7.1@237.2,92.4 ; v1(236.9,103.2) 237,103.1 237,102.6 J1-6.1@237.2,102.4 ; 250.8,70.8 J1-5.1@255.4,70.8 ; J1-3.1@251.7,46.6 252.9,46.6 v2(254,47.7) ; v1(254.4,82.6) 254.4,82.2 J1-11.1@255.4,81.2 ; v1(254.4,92.5) 254.5,92.4 J1-10.1@255.4,92.4 ; v1(254.4,104.5) 254.515,104.385 254.815,104.385 255.6,103.6 J1-9.1@255.6,102.9 ; R1-11.1@258,37.8 259.7,37.8 260,37.5 v2(260,37.2)
  Top Layer w0.4: 55,31.3 55.6,31.9 LED1-11.2@55.6,34.1
  Top Layer w0.5: J1-24.3@70.4,86 70.9,86.5 ; 73.274,86.5 70.9,86.5 ; R4-4.1@85.9,90.077 85.9,91.8 ; R4-4.1@85.923,90.077 R4-4.1@85.946,90.1 ; C1-8.2@95.446,95.1 95.446,96.246 95.493,96.293 95.493,96.707 94.4,97.8 88.2,97.8 85.9,95.5 85.9,91.8 ; R4-5.1@104.546,74.4 104.729,74.217 105.383,74.217 v1(105.46,74.14) ; v1(115.2,74.6) 115.277,74.677 115.277,75.331 R1-5.1@115.446,75.5 ; v1(120.9,79.7) v1(125.3,79.7) ; v1(121.7,94.3) 120.3,95.7 120.3,102.9 124.4,107 v1(124.4,121) ; v1(129.6,91.4) 131.158,91.4 132.451,92.693 134.293,92.693 134.35,92.75 136.65,92.75 C2-1.2@136.7,92.8 ; C2-1.2@136.7,92.7 138.5,92.7 138.6,92.8 C1-2.2@138.6,92.9 ; WD1.5@136.996,74.65 136.996,72.804 v1(137.3,72.5) ; R1-30.1@141.246,80.1 141.708,79.638 141.708,79.233 v1(141.784,79.157) ; N1.5@147.096,77.75 148.942,77.75 149.392,77.3 v1(149.5,77.3) ; v1(205.2,122.5) 205.2,91.4 v1(205.7,90.9) ; 70.9,86.5 69.1,88.3 69.1,90.4 71.2,92.5 77.9,92.5 v1(78.6,91.8) 85.9,91.8
  Top Layer w0.8: VReg2.2@46.032,31.465 48.085,31.465 48.25,31.3 C4-12.2@48.7,31.3 C4-11.2@51.1,31.3
  Top Layer w1: v1(228.6,122.7) 229.1,122.2 v1(229.6,122.2) 231.9,119.9 231.9,101.7 231.6,101.4 231.6,100 231,99.4 v1(231,92.4) 231,85.4 ; v2(241.6,58.2) v1(245,58.2) v2(254,58.2) 282.1,58.2 289.7,50.6 289.7,49.3 290.286,48.714 291.373,48.714 292.665,47.423 H1.19@292.881,47.423 ; v1(249,121.3) 250.3,120 ; 250.6,119.75 250.9,119.45 ; 251.1,71.3 v1(251.1,82.5) v1(251.1,104.5) 251.1,119.55
  Top Layer w1.5: v1(247.8,122.5) v1(249,121.3)
  Top Layer w2: C4-11.2@51.1,31.3 55,31.3 65,31.3 68.5,34.8 v2(76.3,34.8) v2(77.9,34.8) v2(79.3,34.8) v1(131.6,34.8) 159.5,34.8 187,34.8 187.1,34.9 v2(224.9,34.9) v2(227.1,34.9) v2(229.5,34.9)
  Bottom Layer w0.254: H4.6@48.76,4.6 50,5.84 ; 50,12.7 v1(51.3,14) ; 50.033,5.84 50.033,12.7 ; v1(56.4,21.2) 56.5,21.1 77.4,21.1 80.9,24.6 80.9,32.7 v2@78.9,34.7 ; v1(159.4,33.2) 159.6,33 v1(159.6,25.8) ; v1(205.7,90.9) 205.7,90.828 205.3,90.428 205.3,84.9 203.8,83.4 197.9,83.4 196.74,82.24 v1(196.74,80.37) 214.23,80.37 215.2,79.4 215.2,73.8 v1(215,73.6)
  Bottom Layer w0.3: v1(131.6,34.8) 131.6,46.1 132,46.5 v1(132,47.4) ; v1(188.8,122.6) 188.9,122.7 v1@188.9,122.9 ; v1(205.7,90.9) 215.9,90.9 216.3,90.5 v1(216.3,90.4) ; v1(219.5,34.8) 219.5,17.7 v1(220.4,16.8) ; v1(225.3,64.5) 225.9,65.1 v1(232.6,65.1) ; v1(231,92.4) 235.9,92.4 236.031,92.269 v1(236.054,92.269) ; v1(232.1,103.3) 236.8,103.3 v1(236.9,103.2) ; v1(243,34.2) 257,34.2 v2(260,37.2) ; v1(245,58.2) 245.5,58.7 v1(245.5,64.3) ; v1@251,92.5 v1(254.4,92.5) ; v1@251.1,82.6 v1(254.4,82.6) ; v1(251.1,104.5) v1(254.4,104.5) ; v2(254,47.7) v2(254,58.2)
  Bottom Layer w0.5: v1(105.46,74.14) 107.5,72.1 112.7,72.1 v1(115.2,74.6) 119.7,74.6 120.9,75.8 v1(120.9,79.7) 120.9,93.403 121.7,94.203 v1(121.7,94.3) 121.9,94.1 127.252,94.1 128.388,92.964 128.388,92.612 v1(129.6,91.4) ; 123.4,122.9 124.4,121.9 v1(124.4,121) ; v1(125.3,79.7) 132.7,72.3 147.8,72.3 149.5,74 v1(149.5,77.3) ; v1(137.3,72.5) 137.3,74.672 v1(141.784,79.157) ; v1(205.2,122.5) 205.308,122.5 205.709,122.9 206,122.9
  Bottom Layer w1: v2(224.9,34.9) v2(227.1,34.9) ; v2(229.5,34.9) 229.5,34.973 230.1,35.573 230.1,47.2 241.048,58.148 241.548,58.148 v2(241.6,58.2)
  Bottom Layer w1.5: 76,122.9 73.3,122.9 71.1,120.7 71.1,102.5 78.6,95 v1(78.6,91.8) 78.6,84.7 78.6,52.8 ; 76.663,122.9 123.4,122.9 188.9,122.9 205.709,122.9 ; 206,122.9 v1@228.9,122.9 ; v1(228.6,122.7) 229.1,122.7 ; v1(229.6,122.2) 229.1,122.7 ; v1(249,121.3) 247.6,122.7 229.1,122.7
  Bottom Layer w2: v2(76.3,34.8) v2(77.9,34.8) ; 78.7,46.5 78.7,44 77.9,43.2 v2(77.9,34.8) ; 78.8,46.737 78.8,52.4 ; v2(79.3,34.8) v2(77.9,34.8) ; v2(227.1,34.9) v2(229.5,34.9)
  other v1: 251,92.4
3V3Ref: R3-3.2 R5-9.1 Ref1.6 | length 56.5
  Top Layer w0.3: R3-3.2@90,89.8 90,87.5 91.3,86.2 98.6,86.2 v1(100.4,84.4) ; v1(105.1,89.4) 105.2,89.4 106.6,90.8 111.4,90.8 114.03,93.43 116.446,93.43 118.285,95.269 118.285,95.585 v1(118.4,95.7) ; v1(134.8,101) 135.246,101 R5-9.1@135.546,101.3
  Bottom Layer w0.3: v1(100.4,84.4) 100.4,84.7 v1(105.1,89.4) ; v1(118.4,95.7) 122.2,99.5 132.5,99.5 134,101 v1(134.8,101)
3V3S: C1-12.2 C1-14.2 C1-16.2 C7-1.1 LED1-8.2 LvL-1.1 LvL-2.1 LvL-3.1 N2.2 NOT_OK.2 R1-31.1 VReg3.5 | length 173.1
  Top Layer w0.254: C7-1.1@186.9,88.9 186.95,88.95 VReg3.5@188.45,88.95 188.45,91.55 LED1-8.2@188.4,91.6 189.5,92.7 v1(189.5,106.7) 189.5,106.875 189.8,107.175 N2.2@189.8,109.1 ; v1(216.7,110.8) 216.7,112.2 NOT_OK.2@217.2,112.7
  Top Layer w0.3: LED1-8.2@188.4,91.6 R1-31.1@191,91.6 191,90.6 191.9,89.7 195.1,89.7 195.8,89 195.8,87.59 201.99,81.4 v1@205.1,81.4 ; v1(205.2,81.4) v1@205.1,81.4 ; LvL-1.1@206.5,79.9 C1-12.2@203.8,79.9 203.8,80.1 v1@205.1,81.4 ; C1-16.2@215.4,79.9 C1-16.2@215.6,79.9 ; v1(215.9,81.5) 215.9,80.2 C1-16.2@215.6,79.9 ; LvL-3.1@217.65,79.9 C1-16.2@215.6,79.9 ; v1(225.5,59.3) 225.7,59.1 237.7,59.1 238.659,60.059 v1(255.291,60.059) ; LvL-2.1@253.7,41.8 253.7,42.375 253.725,42.4 254.9,42.4 C1-14.2@255.4,42.9 ; v1(255.583,45.465) 255.8,45.248 C1-14.2@255.8,43
  Bottom Layer w0.254: v1(189.5,106.7) 197.2,106.7 201.3,110.8 v1(216.7,110.8)
  Bottom Layer w0.3: v1(205.2,81.4) 205.3,81.5 v1(215.9,81.5) 218.7,81.5 221.3,78.9 221.3,64.9 225.5,60.7 v1(225.5,59.3) ; v1(255.291,60.059) 255.583,59.767 v1(255.583,45.465)
5V: C1-9.2 C1-13.1 C1-15.1 C1-17.1 C4-4.2 C4-5.2 C6-1.1 H1.14 J1-5.3 J1-6.3 J1-7.3 J1-8.3 J1-9.3 J1-10.3 J1-11.3 LED1-10.2 LvL-1.23 LvL-1.24 LvL-2.23 LvL-2.24 LvL-3.23 LvL-3.24 R4-3.1 Ref1.2 VReg1.2 VReg3.1 | length 833.8
  Top Layer w0.254: 55.6,45 LED1-10.2@55.6,48
  Top Layer w0.3: v1(76.1,79) 84.1,79 90.6,72.5 R4-3.1@91.546,72.5 ; C1-9.2@106.546,94.7 Ref1.2@109.846,94.7 110.646,94.7 113.046,97.1 116,97.1 118.9,100 118.9,103.9 123.4,108.4 123.4,119.2 121.6,121 v1(121.6,126.3) ; 233.5,96.3 236.2,96.3 239,93.5 J1-7.3@239,92.4 ; 234.3,85.6 236.094,83.806 237.494,83.806 238.8,82.5 J1-8.3@238.8,81.1 ; 234.8,107.3 235.7,107.3 239,104 J1-6.3@239,102.4 ; 252.6,84.9 252.9,84.9 254.8,84.9 257.2,82.5 J1-11.3@257.2,81.2 ; 252.7,75 254.8,72.9 256.4,72.9 257.2,72.1 J1-5.3@257.2,70.8 ; 252.7,95.2 252.9,95.2 255.1,95.2 257.2,93.1 J1-10.3@257.2,92.4 ; 252.8,107 252.9,107 254.7,107 257.4,104.3 J1-9.3@257.4,102.9
  Top Layer w0.5: v1(187.1,86.7) 187.05,86.65 187.05,85.15 C6-1.1@187,85.1 188.425,85.1 188.45,85.125 VReg3.1@188.45,85.2 ; v1(203.1,126.6) 203.1,88.783 203.123,88.759 203.123,88.477 v1(203.2,88.4) 204.4,87.2 204.4,86.5 C1-13.1@204.6,86.3 LvL-1.24@206.5,86.3 ; v1(206.6,83.7) 206.6,85.9 206.5,86 LvL-1.24@206.5,86.3 ; 206.9,86.3 LvL-1.24@206.5,86.3 ; C1-17.1@214.9,86.4 v1(215.7,86.4) LvL-3.23@218.225,86.4 ; 253.3,35.4 LvL-2.24@253.7,35.4 v2(255,35.4) C1-15.1@255.9,35.4
  Top Layer w1: VReg1.2@46.021,45.154 48.396,45.154 48.55,45 C4-4.2@49,45 ; 234.3,85.6 233.5,86.4 233.5,96.3 233.5,97.6 234.8,98.9 234.8,107.3 v1(234.8,126.8) ; v2(238,39.3) v2(239.6,39.3) ; 252.9,74.9 252.9,84.9 252.9,95.2 252.9,107 252.9,126.8
  Top Layer w1.5: v1(234.8,126.8) 236.225,126.8 v1(236.289,126.736) ; v1(250.5,126.8) v1(252.1,126.8)
  Top Layer w2: C4-4.2@49,45 C4-5.2@51.5,45 55.6,45 69.3,45 v2(71.3,43) 75,39.3 180.4,39.3 ; 180.5,39.4 180.4,39.3 ; v2(238,39.3) v2(236.5,39.3) 180.4,39.3
  Bottom Layer w0.5: v1(187.1,86.7) 188.8,88.4 v1(203.2,88.4) ; v1(206.6,83.7) 209.3,86.4 v1(215.7,86.4)
  Bottom Layer w1: v2(236.5,39.3) v2(238,39.3) v2(239.6,39.3) 254.9,39.3 ; v2(255,35.4) 254.9,35.5 254.9,39.3 ; H1.14@292.881,34.723 290.223,34.723 284.2,28.7 275.4,28.7 264.8,39.3 254.9,39.3
  Bottom Layer w1.5: 75.6,56.7 75.6,93.5 68.2,100.9 68.2,123.1 71.9,126.8 76.5,126.8 ; 76.763,126.8 v1(234.8,126.8) v1(250.5,126.8) v1(252.1,126.8)
  Bottom Layer w2: 75.2,56.3 73.7,54.8 73.7,42.9 ; v2@73.7,40.6 73.7,42.9 ; v2@73.7,40.6 v2(71.3,43) 73.6,43 73.7,42.9 ; v2@73.7,40.6 73.7,40.5 v2(73.9,40.3) 73.9,40.4 v2@73.7,40.6
  other v2: 72.7,41.7
5VB: C7-2.1 Cnt1.16 Cnt2.16 Cnt3.16 J1-24.1 J6.2 R1-33.2 ShiftLED1.6 ShiftLED2.6 VReg5_2.5 | length 93.3
  Top Layer w0.254: v1(67.858,86.25) 67.982,86.127 68.473,86.127 J1-24.1@68.6,86 ; ShiftLED2.6@71.4,83 71.4,84 71.869,84.469 71.869,85.296 v1(71.873,85.3)
  Top Layer w0.3: v1(31.397,95.228) 31.461,95.164 33.436,95.164 Cnt2.16@33.5,95.1 ; Cnt1.16@33.4,101.45 33.45,101.4 35.5,101.4 v1@36.2,100.7 ; v1(36.1,100.6) 36.5,100.6 36.5,100.5 36.8,100.2 C7-2.1@36.9,100.2 ; C7-2.1@36.4,100.5 36.7,100.2 C7-2.1@36.9,100.2 ; v1@37.2,90.4 37.362,90.4 37.487,90.525 38.425,90.525 Cnt3.16@38.5,90.6 ; VReg5_2.5@39.206,98.657 38.481,98.657 38.356,98.782 38.356,98.944 37.1,100.2 C7-2.1@36.9,100.2 ; R1-33.2@57.2,73.7 57.2,73.5 57.5,73.2 57.7,73.2 58.6,72.3 62.1,72.3 62.54,72.74 J6.2@62.54,74 ; J1-24.1@68.6,86 68.6,83.775 68.85,83.525 ShiftLED1.6@68.85,83.1
  Top Layer w0.4: v1@37.2,90.4 39.358,83.17 39.387,83.074 39.485,82.975 42.739,80.76 44.274,80.76 48.215,83.502 cw(c48.443,83.173) 48.736,83.446 ; 48.736,83.445 52.293,79.615 cw(c52,79.343) 52.4,79.343 52.4,77.5 54.4,75.5 55.6,75.5 57.2,73.9 R1-33.2@57.2,73.7
  Bottom Layer w0.254: v1(67.858,86.25) 67.908,86.3 70.873,86.3 v1(71.873,85.3)
  Bottom Layer w0.3: v1(36.1,100.6) 34.1,100.6 31.397,97.897 v1(31.397,95.228) 33.072,95.228 34.498,93.802 34.498,93.102 v1@37.2,90.4 ; J6.2@62.54,74 64,75.46 64,82.392 v1(67.858,86.25)
  other v1: 37.2,90.3
5VB_2: C1-25.1 J6.1 R9-2.2 Timer1.4 Timer1.8 | length 29.7
  Top Layer w0.3: J6.1@60,74 58.6,75.4 57.8,75.4 57.2,76 C1-25.1@57.2,77.2 57.3,77.3 Timer1.4@57.3,79.83 54.17,79.83 53.9,80.1 53.9,83.9 55.5,85.5 61.2,85.5 62.31,84.39 62.31,83.779 62.449,83.64 Timer1.8@63.1,83.64 63.611,83.64 63.75,83.779 63.75,84.85 64,85.1 R9-2.2@65.8,85.1
6V5: C3-4.1 C4-3.1 C4-10.1 C6-2.1 F0.2 LED1-9.2 R2-1.2 VReg1.7 VReg1.8 VReg2.7 VReg2.8 VReg5_2.1 VReg5_2.3 | length 98.8
  Top Layer w0.5: v1(34.5,43.2) 35.9,41.8 ; LED1-9.2@38.6,25.7 40.5,27.6 40.5,30.149 40.454,30.195 VReg2.8@40.232,30.195 ; v1(40.9,84.3) 40.9,89.4 42.1,90.6 42.1,93.9 41.9,94.1 41.9,98.657 ; VReg5_2.1@42.956,98.657 41.9,98.657 ; C6-2.1@45.2,100.6 45.179,100.579 42.977,100.579 42.931,100.532 41.655,100.532 41.362,100.24 41.362,98.95 41.655,98.657 41.9,98.657
  Top Layer w2: F0.2@29.6,40.2 C3-4.1@29.6,36.7 32.7,36.7 R2-1.2@32.8,36.6 ; 34.6,36.6 34.6,36.2 37.4,33.4 C4-10.1@37.4,31.4 38,30.8 39.2,30.8
  Top Layer w3: R2-1.2@32.8,36.6 34.6,36.6 34.6,39.6 38.8,43.8
  Bottom Layer w0.5: v1(34.5,43.2) 34.5,50.6 39.5,55.6 39.5,82.8 v1@40.8,84.1
AD_1: ADC.1 C5-1.2 R5-1.2 TVS-3V3-1.16 | length 14.2
  Top Layer w0.3: ADC.1@93.546,100.9 93.546,101.675 93.621,101.75 94.25,101.75 95.716,103.216 ; TVS-3V3-1.16@95.716,107.3 95.716,103.216 ; C5-1.2@100.346,101.3 R5-1.2@100.346,103.229 100.333,103.216 95.716,103.216
AD_2: ADC.2 C5-2.2 R5-2.2 TVS-3V3-1.15 | length 17.2
  Top Layer w0.3: ADC.2@92.896,100.9 92.896,102.796 94.446,104.346 TVS-3V3-1.15@94.446,107.3 94.446,108.646 94.8,109 96.2,109 98.1,107.1 100.332,107.1 R5-2.2@100.346,107.086 C5-2.2@100.346,105.157